# Altium PCB IOT_Speaker.PcbDoc (part 2 of 3)
Units mil, origin at the board's own origin, x right, y up, seen from the top; angles counter-clockwise.
Board outline 2439.53 x 2669.05 mil, 2 copper layers (Top Layer, Bottom Layer), stack 57 mil thick; 125 components, 73 nets, 403 pads, 148 vias.
Unrouted connection lines stored in the file: 20.
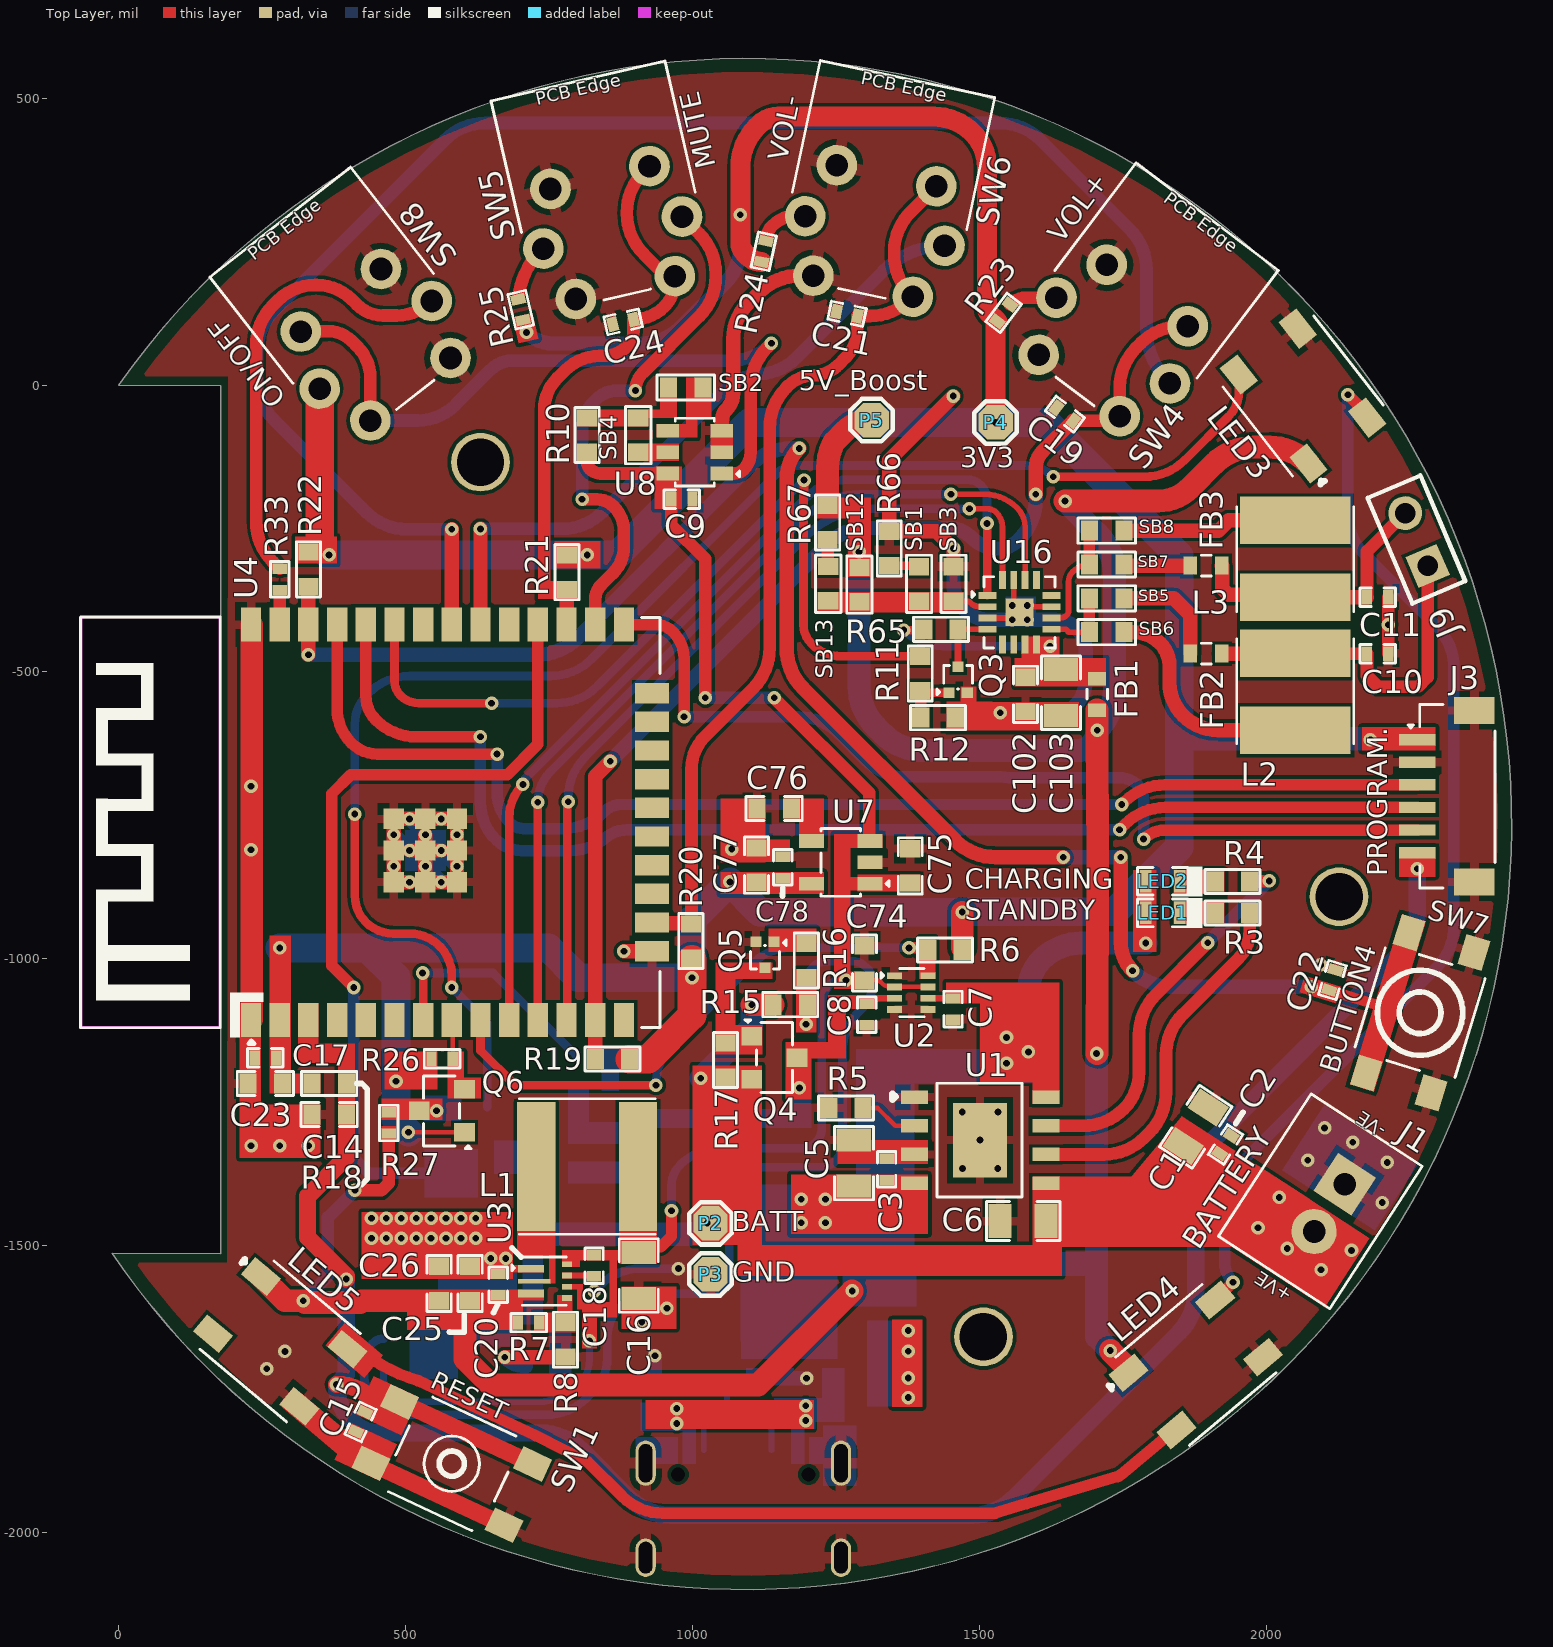
[diagram p0: Top Layer view]

## Part data (continued)
R1 R2: library part RC0603FR-075K1L, "RES 5.1K OHM 1% 1/10W 0603", Case Code (Imperial)=0603, Case Code (Metric)=1608, LCSC Part Number=C105580, Manufacturer=Yageo, Max Operating Temperature=155°C, Max Power Dissipation=100mW, Min Operating Temperature=-55°C, Package Quantity=1, Resistance=5.1kR, Resistance Tolerance=1%, Resistor Type="Thick Film", Temperature Coefficient=100ppm/°C, Voltage Rating=50V, Case/Package=0603, Category="Chip SMD Resistors", ComponentLink1Description=https://datasheet.ciiva.com/46395/443971-46395016.pdf?src-supplier=Element14, ComponentLink1URL=https://datasheet.ciiva.com/46395/443971-46395016.pdf?src-supplier=Element14, ComponentLink2Description=https://datasheet.ciiva.com/2454/pyu-r-int-thick-7-2454046.pdf?src-supplier=Digi-Key, ComponentLink2URL=https://datasheet.ciiva.com/2454/pyu-r-int-thick-7-2454046.pdf?src-supplier=Digi-Key, ComponentLink3Description=https://datasheet.ciiva.com/2454/pyu-r-int-thick-7-2454047.pdf?src-supplier=Digi-Key, ComponentLink3URL=https://datasheet.ciiva.com/2454/pyu-r-int-thick-7-2454047.pdf?src-supplier=Digi-Key, ComponentLink4Description=https://datasheet.ciiva.com/2454/pyu-r-int-thick-7-2454045.pdf?src-supplier=Digi-Key, ComponentLink4URL=https://datasheet.ciiva.com/2454/pyu-r-int-thick-7-2454045.pdf?src-supplier=Digi-Key, ComponentLink5Description=https://datasheet.ciiva.com/15189/getdatasheetpartid-326732-15189786.pdf?src-supplier=Verical, ComponentLink5URL=https://datasheet.ciiva.com/15189/getdatasheetpartid-326732-15189786.pdf?src-supplier=Verical, Construction=Rectangular, Depth=0.8mm, Features="Moisture Resistant", Height=0.022inch, Item Type=Resistor, Lead Free="Lead Free", Length=0.063inch, Manufacturer Part Number=RC0603FR-075K1L, Military Standard=Not, Number of Pins=2, Number of Terminations=2, Packaging="Tape and Reel", Power Rating=100mW, Pricing 1="5000=0.00133, 10000=0.00131, 20000=0.00127 (USD)", Reach SVHC Compliant=Yes, RoHS=Yes, RoHS Compliant=Yes, Series=RC, Size Code=0603, Stock 1=100000, Supplier 1=Avnet, Supplier Part Number 1=RC0603FR-075K1L, Termination=SMD/SMT, Tolerance=1%, Voltage Rating (DC)=50V, Width=0.031inch
R3: library part RC0603FR-07220RL, "RES SMD 220 OHM 1% 1/10W 0603", Case Code (Imperial)=0603, Case Code (Metric)=1608, LCSC Part Number=C107696, Manufacturer=Yageo, Max Operating Temperature=155°C, Max Power Dissipation=100mW, Min Operating Temperature=-55°C, Package Quantity=1, Supplier Part Number 1=311-220HRCT-ND, Temperature Coefficient=100ppm/°C, Tolerance=1%, Voltage Rating=50V, Case/Package=0603, ComponentLink1Description=http://www.yageo.com/documents/recent/PYu-RC_Group_51_RoHS_L_10.pdf?src-supplier=Digi-Key, ComponentLink1URL=http://www.yageo.com/documents/recent/PYu-RC_Group_51_RoHS_L_10.pdf?src-supplier=Digi-Key, ComponentLink2Description=http://www.farnell.com/datasheets/1868787.pdf?src-supplier=Element14, ComponentLink2URL=http://www.farnell.com/datasheets/1868787.pdf?src-supplier=Element14, Composition="Thick Film", Depth=0.8mm, Features="Moisture Resistant", Height=0.022inch, Item Type=Resistor, Lead Free="Lead Free", Length=1.6mm, Manufacturer Part Number=RC0603FR-07220RL, Military Standard=Not, Number of Pins=2, Number of Terminations=2, Packaging="Tape and Reel", Power Rating=100mW, Pricing 1="1=0.1, 10=0.023, 100=0.0094, 1000=0.00421, 2500=0.00366 (USD)", REACH SVHC="No SVHC", Resistance=220R, Stock 1=5843995, Supplier 1=Digi-Key, Termination=SMD/SMT, Voltage Rating (DC)=50V, Width=0.031inch
R4: library part RC0603JR-07330RL, "RES  SMD 330R 100 mW 0603", Case Code (Imperial)=0603, Case Code (Metric)=1608, LCSC Part Number=C105879, Manufacturer=Yageo, Max Operating Temperature=155°C, Max Power Dissipation=100mW, Min Operating Temperature=-55°C, Package Quantity=5000, Resistance Tolerance=5%, Resistor Type="Thick Film", Supplier Part Number 1=311-330GRCT-ND, Temperature Coefficient=100ppm/°C, Voltage Rating=50V, Case/Package=0603, Category="Chip SMD Resistors", Construction=Rectangular, Depth=0.8mm, Features="Moisture Resistant", Height=0.45mm, Item Type=Resistor, Lead Free="Lead Free", Length=1.6mm, Manufacturer Part Number=RC0603JR-07330RL, Military Standard=Not, Number of Pins=2, Number of Terminations=2, Packaging="Tape and Reel", Power Rating=100mW, Pricing 1="1=0.10000, 10=0.02000, 100=0.00800, 1000=0.00360, 2500=0.00312 (USD)", REACH SVHC="No SVHC", Resistance=330R, RoHS=Yes, RoHS Compliant=Yes, Series=RC, Size Code=0603, Stock 1=1074593, Supplier 1=Digi-Key, Termination=SMD/SMT, Tolerance=5%, Voltage Rating (DC)=50V, Width=0.8mm
R5: library part 0603WAF1201T5E, "Thick Film Resistors 75V 1.2kΩ 0603 Chip Resistor - Surface Mount ROHS", LCSC Part Number=C22765, Manufacturer=UNI-ROYAL, ComponentLink1Description=LCSC, ComponentLink1URL=https://lcsc.com/product-detail/Chip-Resistor-Surface-Mount_UNI-ROYAL-Uniroyal-Elec-0603WAF1201T5E_C22765.html, Footpint=0603, Item Type=Resistor, Manufacturer Part Number=0603WAF1201T5E
R6 R10 R15 R18 R19 R20 R21 R22: library part RC0603FR-0710KL, "RES SMD 10K Ohm 1% 1/10W 0603", Case Code (Imperial)=0603, Case Code (Metric)=1608, LCSC Part Number=C98220, Manufacturer=Yageo, Max Operating Temperature=155°C, Max Power Dissipation=100mW, Min Operating Temperature=-55°C, Resistance=10kR, Resistance Tolerance=1%, Resistor Type="Thick Film", Supplier Part Number 1=311-10.0KHRCT-ND, Temperature Coefficient=100ppm/°C, Voltage Rating=75V, Voltage Rating (DC)=50V, Case/Package=0603, Category="Chip SMD Resistors", ComponentLink1Description=https://datasheet.ciiva.com/7660/38590-7660789.pdf?src-supplier=Element14, ComponentLink1URL=https://datasheet.ciiva.com/7660/38590-7660789.pdf?src-supplier=Element14, ComponentLink2Description=https://datasheet.ciiva.com/7983/443971-7983596.pdf?src-supplier=Element14, ComponentLink2URL=https://datasheet.ciiva.com/7983/443971-7983596.pdf?src-supplier=Element14, ComponentLink3Description=https://datasheet.ciiva.com/22747/443971-22747519.pdf?src-supplier=Element14, ComponentLink3URL=https://datasheet.ciiva.com/22747/443971-22747519.pdf?src-supplier=Element14, ComponentLink4Description=https://datasheet.ciiva.com/46440/1868787-46440891.pdf?src-supplier=Element14, ComponentLink4URL=https://datasheet.ciiva.com/46440/1868787-46440891.pdf?src-supplier=Element14, ComponentLink5Description=https://datasheet.ciiva.com/7746/1738695-7746239.pdf?src-supplier=Element14, ComponentLink5URL=https://datasheet.ciiva.com/7746/1738695-7746239.pdf?src-supplier=Element14, ComponentLink6Description=https://datasheet.ciiva.com/15189/getdatasheetpartid-409289-15189591.pdf?src-supplier=Verical, ComponentLink6URL=https://datasheet.ciiva.com/15189/getdatasheetpartid-409289-15189591.pdf?src-supplier=Verical, Construction=Rectangular, Depth=0.8mm, Features="Moisture Resistant", Height=0.45mm, Item Type=Resistor, Lead Free="Lead Free", Lead Pitch=0.3mm, Length=1.6mm, Manufacturer Part Number=RC0603FR-0710KL, Military Standard=Not, Number of Pins=2, Number of Terminations=2, Packaging="Tape and Reel", Power Rating=100mW, Pricing 1="1=0.10000, 10=0.02400, 100=0.00970, 1000=0.00436, 2500=0.00378 (USD)", REACH SVHC=Unknown, RoHS=Yes, RoHS Compliant=Yes, Series=RC, Size Code=0603, Stock 1=25249139, Supplier 1=Digi-Key, Termination=SMD/SMT, Tolerance=1%, Weight=7.1E-05oz, Width=0.8mm
R7: library part FRC0402F7323TS, "±1% 732kΩ 0402 Chip Resistor - Surface Mount ROHS", LCSC Part Number=C5159692, Manufacturer=FOJAN, Package=0402, ComponentLink1Description=LCSC, ComponentLink1URL=https://www.lcsc.com/product-detail/Chip-span-style-background-color-ff0-Resistor-span-Surface-Mount_FOJAN-FRC0402F7323TS_C5159692.html, Item Type=Resistor, Manufacturer Part Number=FRC0402F7323TS
R8 R66 R67: library part RT0603BRD07100KL, "RES SMD 100K OHM 0.1% 1/10W 0603", Case Code (Imperial)=0603, Case Code (Metric)=1608, LCSC Part Number=C122538, Manufacturer=Yageo, Max Operating Temperature=125°C, Max Power Dissipation=100mW, Min Operating Temperature=-55°C, Package Quantity=5000, Resistance=100kR, Supplier Part Number 1=YAG1235CT-ND, Temperature Coefficient=25ppm/°C, Tolerance=0.1%, Voltage Rating=75V, Case/Package=0603, ComponentLink1Description=http://documents.rs-components.com/techlib://itc_doclist_GB.htm?stockno=6174810&src-supplier=RSComponents, ComponentLink1URL=http://documents.rs-components.com/techlib://itc_doclist_GB.htm?stockno=6174810&src-supplier=RSComponents, Composition="Thin Film", Depth=0.8mm, Features="Moisture Resistant", Height=0.022inch, Item Type=Resistor, Lead Free="Lead Free", Length=1.6mm, Manufacturer Part Number=RT0603BRD07100KL, Military Standard=Not, Mount="Surface Mount", Number of Terminations=2, Packaging="Tape and Reel", Power Rating=100mW, Pricing 1="1=0.39, 10=0.332, 100=0.1298, 1000=0.05435, 2500=0.04982 (USD)", Stock 1=53395, Supplier 1=Digi-Key, Termination=SMD/SMT, Voltage Rating (DC)=75V, Width=0.031inch, Working Voltage=75V
R9 R12 R54: library part RC0603JR-0747KL, "RES 47K OHM 5% 1/10W 0603", Case Code (Imperial)=0603, Case Code (Metric)=1608, LCSC Part Number=C127447, Manufacturer=Yageo, Max Operating Temperature=155°C, Max Power Dissipation=100mW, Min Operating Temperature=-55°C, Package Quantity=5000, Resistance=47kR, Resistance Tolerance=1%, Resistor Type="Thick Film", Temperature Coefficient=100ppm/°C, Tolerance=5%, Voltage Rating=50V, Case/Package=0603, Category="Chip SMD Resistors", ComponentLink1Description=http://www.farnell.com/datasheets/443971.pdf, ComponentLink1URL=http://www.farnell.com/datasheets/443971.pdf, ComponentLink2Description=http://www.mouser.com/catalog/specsheets/RC0603.pdf, ComponentLink2URL=http://www.mouser.com/catalog/specsheets/RC0603.pdf, ComponentLink3Description=https://datasheet.ciiva.com/46395/443971-46395003.pdf?src-supplier=Element14, ComponentLink3URL=https://datasheet.ciiva.com/46395/443971-46395003.pdf?src-supplier=Element14, ComponentLink4Description=https://datasheet.ciiva.com/12558/rc0603-272842-12558744.pdf?src-supplier=Mouser, ComponentLink4URL=https://datasheet.ciiva.com/12558/rc0603-272842-12558744.pdf?src-supplier=Mouser, Composition="Thick Film", Construction=Rectangular, Depth=0.8mm, Features="Moisture Resistant", Height=0.45mm, Lead Free="Lead Free", Length=1.6mm, Manufacturer Part Number=RC0603JR-0747KL, Military Standard=Not, Number of Pins=2, Number of Terminations=2, Packaging="Tape and Reel", Power Rating=100mW, Pricing 1="5000=0.0025, 10000=0.0022, 25000=0.0019, 1=0.0011, 6000=0.001 (USD)", Pricing 2="1=0.10000, 10=0.02300, 100=0.00930, 1000=0.00417, 2500=0.00362 (USD)", REACH SVHC="No SVHC", RoHS=Yes, RoHS Compliant=Yes, Series=RC, Size Code=0603, Stock 1=599135, Stock 2=1087850, Supplier 1=Arrow, Supplier 2=Digi-Key, Supplier Part Number 1=RC0603JR-0747KL, Supplier Part Number 2=311-30.0KHRCT-ND, Termination=SMD/SMT, Voltage Rating (DC)=50V, Width=0.8mm
R11 R56: library part RC0603JR-074K7L, "RES SMD 4.7K OHM 5% 1/10W 0603", Case Code (Imperial)=0603, Case Code (Metric)=1608, LCSC Part Number=C105428, Manufacturer=Yageo, Max Operating Temperature=155°C, Min Operating Temperature=-55°C, Power Rating=100mW, Resistance=4.7kR, Supplier Part Number 1=311-4.7KGRCT-ND, Temperature Coefficient=100ppm/°C, Tolerance=5%, Voltage Rating=50V, Case/Package=0603, ComponentLink1Description=http://www.farnell.com/datasheets/443971.pdf?src-supplier=Element14, ComponentLink1URL=http://www.farnell.com/datasheets/443971.pdf?src-supplier=Element14, Composition="Thick Film", Depth=0.8mm, Lead Free="Lead Free", Length=1.6mm, Manufacturer Part Number=RC0603JR-074K7L, Military Standard=Not, Number of Pins=2, Packaging="Tape and Reel", Pricing 1="1=0.1, 10=0.02, 100=0.0081, 1000=0.00362, 2500=0.00314 (USD)", REACH SVHC="No SVHC", Stock 1=19706643, Supplier 1=Digi-Key, Termination=SMD/SMT, Voltage Rating (DC)=50V, Width=0.8mm
  R56: Item Type=Resistor
R13 R14: library part RC0603FR-070RL, "RES SMD 0R, 1%, 0.1W, 0603", LCSC Part Number=C100044, Manufacturer=Yageo, Package=0603, ComponentLink9Description=LCSC, ComponentLink9URL=https://www.lcsc.com/product-detail/Chip-Resistor-Surface-Mount_YAGEO-RC0603FR-070RL_C100044.html, Item Type=Resistor, Manufacturer Part Number=RC0603FR-070RL
R16 R17 R28 R55: library part RC0603FR-071KL, "RES SMD 1K OHM 1% 1/10W 0603", Case Code (Imperial)=0603, Case Code (Metric)=1608, LCSC Part Number=C22548, Manufacturer=Yageo, Max Operating Temperature=155°C, Min Operating Temperature=-55°C, Power Rating=100mW, Resistance=1kR, Supplier Part Number 1=311-1.00KHRDKR-ND, Temperature Coefficient=100ppm/°C, Tolerance=1%, Voltage Rating=50V, Case/Package=0603, ComponentLink1Description=https://www.verical.com/server-webapp/html/getDatasheet?partID=409289&src-supplier=Verical, ComponentLink1URL=https://www.verical.com/server-webapp/html/getDatasheet?partID=409289&src-supplier=Verical, ComponentLink2Description=http://documents.rs-components.com/techlib://itc_doclist_GB.htm?stockno=5048928&src-supplier=RSComponents, ComponentLink2URL=http://documents.rs-components.com/techlib://itc_doclist_GB.htm?stockno=5048928&src-supplier=RSComponents, ComponentLink3Description=http://www.yageo.com/documents/recent/PYu-RC0603_51_RoHS_L_4.pdf?src-supplier=Avnet+Europe, ComponentLink3URL=http://www.yageo.com/documents/recent/PYu-RC0603_51_RoHS_L_4.pdf?src-supplier=Avnet+Europe, ComponentLink4Description=http://www.farnell.com/datasheets/2167052.pdf?src-supplier=Element14, ComponentLink4URL=http://www.farnell.com/datasheets/2167052.pdf?src-supplier=Element14, ComponentLink5Description=http://www.farnell.com/datasheets/1868787.pdf?src-supplier=Element14, ComponentLink5URL=http://www.farnell.com/datasheets/1868787.pdf?src-supplier=Element14, ComponentLink6Description=http://www.yageo.com/documents/recent/PYu-RC_Group_51_RoHS_L_2.pdf?src-supplier=Avnet, ComponentLink6URL=http://www.yageo.com/documents/recent/PYu-RC_Group_51_RoHS_L_2.pdf?src-supplier=Avnet, ComponentLink7Description=https://www.verical.com/server-webapp/html/getDatasheet?partID=404327&src-supplier=Verical, ComponentLink7URL=https://www.verical.com/server-webapp/html/getDatasheet?partID=404327&src-supplier=Verical, ComponentLink8Description=http://www.farnell.com/datasheets/443971.pdf?src-supplier=Element14, ComponentLink8URL=http://www.farnell.com/datasheets/443971.pdf?src-supplier=Element14, Composition="Thick Film", Contact Plating=Tin,Matte, Depth=0.8mm, Height=0.45mm, Item Type=Resistor, Lead Free="Lead Free", Length=1.6mm, Manufacturer Part Number=RC0603FR-071KL, Military Standard=Not, Packaging="Tape and Reel", Pricing 1="1=0.1, 10=0.023, 100=0.0094, 1000=0.0042, 2500=0.0037 (USD)", Radiation Hardening=No, REACH SVHC="No SVHC", Stock 1=21472395, Supplier 1=Digi-Key, Termination=SMD/SMT
R23 R24 R25 R33: library part ERA2AEB680X, "RES SMD 68 OHM 0.1% 1/16W 0402", Case Code (Imperial)=0402, Case Code (Metric)=1005, LCSC Part Number=C445573, Manufacturer=Panasonic, Manufacturer Part Number=ERA-2AEB680X, Max Operating Temperature=155°C, Max Power Dissipation=63mW, Min Operating Temperature=-55°C, Package Quantity=10000, Resistor Type="Thin Film,Metal Film", Temperature Coefficient=25ppm/°C, Tolerance=0.1%, Voltage Rating=25V, Case/Package=0402, Category="Chip SMD Resistors", ComponentLink1Description=https://datasheet.ciiva.com/5838/328837-5838032.pdf?src-supplier=Farnell, ComponentLink1URL=https://datasheet.ciiva.com/5838/328837-5838032.pdf?src-supplier=Farnell, ComponentLink2Description=https://datasheet.ciiva.com/11812/0900766b80beefcc-11812130.pdf?src-supplier=RSComponents, ComponentLink2URL=https://datasheet.ciiva.com/11812/0900766b80beefcc-11812130.pdf?src-supplier=RSComponents, ComponentLink3Description=https://datasheet.ciiva.com/7657/328837-7657366.pdf?src-supplier=Element14, ComponentLink3URL=https://datasheet.ciiva.com/7657/328837-7657366.pdf?src-supplier=Element14, ComponentLink4Description=https://datasheet.ciiva.com/7944/328837-7944487.pdf?src-supplier=Element14, ComponentLink4URL=https://datasheet.ciiva.com/7944/328837-7944487.pdf?src-supplier=Element14, ComponentLink5Description=https://datasheet.ciiva.com/17208/aoa0000ce26-17208797.pdf?src-supplier=Avnet+Europe, ComponentLink5URL=https://datasheet.ciiva.com/17208/aoa0000ce26-17208797.pdf?src-supplier=Avnet+Europe, Contact Plating=Tin, Depth=0.5mm, Height=0.35mm, Lead Free="Lead Free", Length=1mm, Military Standard=Not, Mount="Surface Mount", Number of Pins=2, Number of Terminations=2, Packaging="Tape and Reel", Power Rating=63mW, Pricing 1="1=0.36470, 10000=0.05710 (USD)", Radiation Hardening=No, REACH SVHC="No SVHC", Resistance=68R, RoHS=Yes, Stock 1=1, Supplier 1="Arrow Electronics", Supplier Part Number 1=ERA-2AEB680X, Voltage Rating (DC)=25V, Width=0.02inch
R26 R27: library part RC0402FR-0710KL, "RES 10K OHM 1% 1/16W 0402", Case Code (Imperial)=0402, Case Code (Metric)=1005, LCSC Part Number=C60490, Manufacturer=Yageo, Max Operating Temperature=155°C, Max Power Dissipation=63mW, Min Operating Temperature=-55°C, Power Rating=62.5mW, Resistance=10kR, Resistance Tolerance=1%, Resistor Type="Thick Film", Supplier Part Number 1=603-RC0402FR-0710KL, Temperature Coefficient=100ppm/°C, Voltage Rating=50V, Case/Package=0402, Category="Chip SMD Resistors", ComponentLink1Description=https://datasheet.ciiva.com/7660/38568-7660787.pdf?src-supplier=Element14, ComponentLink1URL=https://datasheet.ciiva.com/7660/38568-7660787.pdf?src-supplier=Element14, ComponentLink2Description=https://datasheet.ciiva.com/7849/1686128-7849814.pdf?src-supplier=Element14, ComponentLink2URL=https://datasheet.ciiva.com/7849/1686128-7849814.pdf?src-supplier=Element14, ComponentLink3Description=https://datasheet.ciiva.com/7983/1018594-7983486.pdf?src-supplier=Element14, ComponentLink3URL=https://datasheet.ciiva.com/7983/1018594-7983486.pdf?src-supplier=Element14, ComponentLink4Description=https://datasheet.ciiva.com/22747/1018594-22747512.pdf?src-supplier=Element14, ComponentLink4URL=https://datasheet.ciiva.com/22747/1018594-22747512.pdf?src-supplier=Element14, ComponentLink5Description=https://datasheet.ciiva.com/12667/pyu-rc0402-51-rohs-l-6-r-12667067.pdf?src-supplier=Mouser, ComponentLink5URL=https://datasheet.ciiva.com/12667/pyu-rc0402-51-rohs-l-6-r-12667067.pdf?src-supplier=Mouser, ComponentLink6Description=https://datasheet.ciiva.com/7849/1784430-7849813.pdf?src-supplier=Element14, ComponentLink6URL=https://datasheet.ciiva.com/7849/1784430-7849813.pdf?src-supplier=Element14, ComponentLink7Description=https://datasheet.ciiva.com/7849/1784430-7849815.pdf?src-supplier=Element14, ComponentLink7URL=https://datasheet.ciiva.com/7849/1784430-7849815.pdf?src-supplier=Element14, Construction=Rectangular, Depth=0.5mm, Features="Moisture Resistant", Height=0.32mm, Item Type=Resistor, Lead Free="Lead Free", Lead Pitch=0.2mm, Length=1mm, Manufacturer Part Number=RC0402FR-0710KL, Military Standard=Not, Number of Pins=2, Number of Terminations=2, Packaging="Tape and Reel", Pricing 1="1=0.10000, 10=0.01400, 50=0.01400, 100=0.00500, 1000=0.00300, 10000=0.00200 (USD)", REACH SVHC="No SVHC", RoHS=Yes, RoHS Compliant=Yes, Series=RC, Stock 1=18648329, Supplier 1=Mouser, Termination=SMD/SMT, Tolerance=1%, Voltage Rating (DC)=50V, Width=0.5mm, Working Voltage=50V
R65: library part RC0603FR-071ML, "RES SMD 1M OHM 1% 1/10W 0603", Case Code (Imperial)=0603, Case Code (Metric)=1608, LCSC Part Number=C105578, Manufacturer=Yageo, Max Operating Temperature=155°C, Min Operating Temperature=-55°C, Package Quantity=5000, Power Rating=100mW, Resistance=1MR, Supplier Part Number 1=311-1.00MHRDKR-ND, Temperature Coefficient=100ppm/°C, Tolerance=1%, Voltage Rating=50V, Case/Package=0603, ComponentLink1Description=http://www.farnell.com/datasheets/2167052.pdf?src-supplier=Mouser, ComponentLink1URL=http://www.farnell.com/datasheets/2167052.pdf?src-supplier=Mouser, ComponentLink2Description=http://www.farnell.com/datasheets/2167052.pdf?src-supplier=Element14, ComponentLink2URL=http://www.farnell.com/datasheets/2167052.pdf?src-supplier=Element14, ComponentLink3Description=http://documents.rs-components.com/techlib://itc_doclist_GB.htm?stockno=5048956&src-supplier=RSComponents, ComponentLink3URL=http://documents.rs-components.com/techlib://itc_doclist_GB.htm?stockno=5048956&src-supplier=RSComponents, Composition="Thick Film", Depth=0.8mm, Height=0.45mm, Lead Free="Lead Free", Length=1.6mm, Manufacturer Part Number=RC0603FR-071ML, Military Standard=Not, Number of Pins=2, Packaging="Tape and Reel", Pricing 1="1=0.1, 10=0.023, 100=0.0094, 1000=0.00421, 2500=0.00366 (USD)", REACH SVHC="No SVHC", Stock 1=3824601, Supplier 1=Digi-Key, Termination=SMD/SMT, Voltage Rating (DC)=50V, Width=0.8mm
SB1 SB2 SB3 SB4 SB5 SB6 SB7 SB8 SB12 SB13: "Solder Bridge ON", Manufacturer Part Number="Solder Bridge", Item Type="Solder Bridge"
SW1: "No NO 50mA 4.5mm 100000 260gf 12V -30℃~+85℃ 4.5mm 4.3mm Black Round Button Brick nogging SPST SMD Tactile Switches ROHS", LCSC Part Number=C381037, Manufacturer="XKB Connectivity", Package=Custom, ComponentLink1Description=LCSC, ComponentLink1URL=https://www.lcsc.com/product-detail/Tactile-Switches_XKB-Connectivity-TS-1109S-C-B_C381037.html, Item Type=Switch, Manufacturer Part Number=TS-1109S-C-B
SW4 SW5 SW6 SW8: "SWITCH TACTILE SPST-NO 0.05A 12V", Current Rating=50mA, Illumination Color=Green, Manufacturer=E-Switch, Max Operating Temperature=70°C, Min Operating Temperature=-20°C, Operating Force=160gf, Package Quantity=1, Supplier Part Number 1=EG6023-ND, Voltage Rating (DC)=12V, Actuator Material=PBT,Polybutylene, Category="Tactile Switches", ComponentLink1Description=https://datasheet.ciiva.com/2902/b200003h-2902974.pdf?src-supplier=Digi-Key, ComponentLink1URL=https://datasheet.ciiva.com/2902/b200003h-2902974.pdf?src-supplier=Digi-Key, Illumination Type=LED,Illuminated, Item Type="Tactile Switch", Lead Free="Lead Free", Manufacturer Part Number=TL1260GQRBLK, Mechanical Life=50000Cycles, Mounting Technology="Through Hole", Packaging=Bulk, Pricing 1="1=3.53, 10=3.387, 25=3.0924, 100=2.6801, 250=2.42976, 500=2.25304, 1000=2.09106, 2500=1.89963, 5000=1.8225 (USD)", RoHS=Yes, RoHS Compliant=Yes, Series=TL1260, Stock 1=1154, Supplier 1=Digi-Key, Switch Function=Off-Mom, Switch Travel=0.2mm, Termination="PC Pin", Throw Configuration=SPST
SW7: "No NO 50mA 4.5mm 100000 160gf 12V -30℃~+85℃ 4.5mm 8mm Black Round Button Brick nogging SPST SMD Tactile Switches ROHS", LCSC Part Number=C480323, Manufacturer="XKB Connectivity", Package=SMD, ComponentLink1Description=LCSC, ComponentLink1URL=https://www.lcsc.com/product-detail/span-style-background-color-ff0-Tactile-span-Switches_XKB-Connectivity-TS-1109S-B-J_C480323.html, Item Type=Switch, Manufacturer Part Number=TS-1109S-B-J
U1: "ESOP-8 Battery Management ICs ROHS", LCSC Part Number=C16581, Manufacturer=TOPPOWER, Package=ESOP-8, ComponentLink1Description=LCSC, ComponentLink1URL=https://www.lcsc.com/product-detail/Battery-Management-ICs_TOPPOWER-Nanjing-Extension-Microelectronics-TP4056-42-ESOP8_C16581.html, Item Type=Mosfet, Manufacturer Part Number=TP4056-42-ESOP8
U2: "OR Controller N+1 ORing Controller N-Channel 2:1 SOT-583", LCSC Part Number=C3235556, Manufacturer="Texas Instruments", Supplier Part Number 1=595-LM66200DRLR, Category="Integrated Circuits (ICs)", Item Type=IC, Manufacturer Part Number=LM66200DRLR, Pricing 1="1=0.80000, 10=0.70000, 50=0.65800, 100=0.53700, 1000=0.34000, 10000=0.30700 (USD)", RoHS=No, Stock 1=11717, Supplier 1=Mouser
U3: "8-A boost converter with 0.5-V ultra-low input voltage 7-VQFN-HR -40 to 125", LCSC Part Number=C915088, Manufacturer="Texas Instruments", Supplier Part Number 1=296-TPS61022RWURDKR-ND, Category="Voltage Regulators - Switching", ComponentLink1Description=LCSC, ComponentLink1URL=https://www.lcsc.com/product-detail/DC-DC-Converters_Texas-Instruments-TPS61022RWUR_C915088.html, Item Type=IC, Manufacturer Part Number=TPS61022RWUR, Pricing 1="1=1.88000, 10=1.68800, 25=1.59280, 100=1.35690, 250=1.27412, 500=1.11486, 1000=0.92374 (USD)", RoHS=Yes, Supplier 1=Digi-Key
U4: "SMD,18x25.5mm WiFi Modules ROHS", LCSC Part Number=C701342, Manufacturer="Espressif Systems", Supplier Part Number 1=356-ESP32WRM32E164PH, Category=Uncategorized, ComponentLink1Description=LCSC, ComponentLink1URL=https://www.lcsc.com/product-detail/WiFi-Modules_Espressif-Systems-ESP32-WROOM-32E-N8_C701342.html, Item Type=Module, Manufacturer Part Number=ESP32-WROOM-32E-N8, Pricing 1="1=3.30000, 10=3.30000, 50=3.30000, 100=3.30000, 1000=3.30000, 10000=3.30000 (USD)", RoHS=No, Stock 1=24616, Supplier 1=Mouser
U7: "SPX3819 Series 3.3 V 500 mA Fixed Output SMT LDO Regulator - SOT-23-5", LCSC Part Number=C9055, Manufacturer=MaxLinear, Supplier Part Number 1=23R9703, Category="Voltage Regulators - Linear", ComponentLink1Description=LCSC, ComponentLink1URL=https://www.lcsc.com/product-detail/Linear-Voltage-Regulators-LDO_MaxLinear-SPX3819M5-L-3-3-TR_C9055.html, Item Type=IC, Manufacturer Part Number=SPX3819M5-L-3-3/TR, RoHS=Yes, RoHS Compliant=Yes, Supplier 1=Newark
U8: "IC CNTRLR ON/OFF W/DEB TSOT23-6", Case/Package=SOT-23-6, LCSC Part Number=C79401, Manufacturer=Maxim, Max Operating Temperature=125°C, Max Power Dissipation=727W, Max Supply Voltage=5.5V, Min Operating Temperature=-40°C, Min Supply Voltage=2.7V, Number of Voltages Monitored=1, Operating Supply Current=7uA, Undervoltage Threshold=1.8V, Category="Interface ICs", ComponentLink1Description=https://datasheet.ciiva.com/4901/max16054-83881-4901086.pdf?src-supplier=Mouser, ComponentLink1URL=https://datasheet.ciiva.com/4901/max16054-83881-4901086.pdf?src-supplier=Mouser, ComponentLink2Description=https://datasheet.ciiva.com/1784/max16054-1784560.pdf?src-supplier=Digi-Key, ComponentLink2URL=https://datasheet.ciiva.com/1784/max16054-1784560.pdf?src-supplier=Digi-Key, ComponentLink3Description=https://datasheet.ciiva.com/14247/max16054-14247770.pdf?src-supplier=Avnet, ComponentLink3URL=https://datasheet.ciiva.com/14247/max16054-14247770.pdf?src-supplier=Avnet, ComponentLink4Description=https://datasheet.ciiva.com/1784/max16054-1784561.pdf?src-supplier=Digi-Key, ComponentLink4URL=https://datasheet.ciiva.com/1784/max16054-1784561.pdf?src-supplier=Digi-Key, ComponentLink5Description=https://datasheet.ciiva.com/1784/max16054-1784562.pdf?src-supplier=Digi-Key, ComponentLink5URL=https://datasheet.ciiva.com/1784/max16054-1784562.pdf?src-supplier=Digi-Key, Contact Plating=Tin,Matte, Height=0.73mm, Item Type=IC, Length=4mm, Manufacturer Part Number=MAX16054AZT+T, Mounting Technology="Surface Mount", Output Type=PUSH-PULL, Package Quantity=1, Packaging="Tape and Reel", Pins=6, Pricing 1="1=2.99700 (USD)", Radiation Hardening=No, RoHS=Yes, RoHS Compliant=Yes, Series=-, Stock 1=3, Supplier 1="Arrow Electronics", Supplier Part Number 1=MAX16054AZT+T, Watchdog Timer=No, Width=4mm
U10: "Power Supply Support Circuit, Fixed, 1 Channel, +3.1V, CMOS, PDSO5", Case/Package=LSSOP, LCSC Part Number=C253184, Manufacturer=Rohm, Max Operating Temperature=125°C, Min Operating Temperature=-25°C, Nominal Supply Voltage=2.4V, Package Body Material=Plastic, Package Equivalence Code=TSOP5/6,.11,37, Package Shape=Rectangular, Package Style="SMALL OUTLINE, LOW PROFILE, SHRINK PITCHMeter", Power Supplies=1.8/5V, Supplier Part Number 1=755-BU4231G-TR, Temperature Grade=OTHER, Threshold Voltage-Nom=3.1V, Adjustable Threshold=No, Category="Voltage Supervisors", Channels=1, ComponentLink1Description=https://datasheet.ciiva.com:443/pdfs/VipMasterIC/IC/ROHM/ROHMS33934/ROHMS34686-1.pdf?src-supplier=IHS+Markit, ComponentLink1URL=https://datasheet.ciiva.com:443/pdfs/VipMasterIC/IC/ROHM/ROHMS33934/ROHMS34686-1.pdf?src-supplier=IHS+Markit, ComponentLink2Description=https://datasheet.ciiva.com/6601/bu42xxg-e-6601781.pdf?src-supplier=Digi-Key, ComponentLink2URL=https://datasheet.ciiva.com/6601/bu42xxg-e-6601781.pdf?src-supplier=Digi-Key, ComponentLink3Description=https://datasheet.ciiva.com/6601/bu42xxg-e-6601782.pdf?src-supplier=Digi-Key, ComponentLink3URL=https://datasheet.ciiva.com/6601/bu42xxg-e-6601782.pdf?src-supplier=Digi-Key, ComponentLink4Description=https://datasheet.ciiva.com/6601/bu42xxg-e-6601784.pdf?src-supplier=Digi-Key, ComponentLink4URL=https://datasheet.ciiva.com/6601/bu42xxg-e-6601784.pdf?src-supplier=Digi-Key, ComponentLink5Description=https://datasheet.ciiva.com/22735/1747282-22735962.pdf?src-supplier=Element14, ComponentLink5URL=https://datasheet.ciiva.com/22735/1747282-22735962.pdf?src-supplier=Element14, ComponentLink6Description=https://datasheet.ciiva.com/15105/getdatasheetpartid-450589-15105309.pdf?src-supplier=Verical, ComponentLink6URL=https://datasheet.ciiva.com/15105/getdatasheetpartid-450589-15105309.pdf?src-supplier=Verical, Height - Seated (Max)=1.25mm, Item Type=IC, JESD-30 Code=R-PDSO-G5, Length=2.9mm, Manufacturer Part Number=BU4231G-TR, Moisture Sensitivity Level=1, Number of Channels=1, Pins=5, Pricing 1="1=0.63000, 10=0.53400, 50=0.53400, 100=0.37000, 1000=0.24200, 10000=0.22000 (USD)", Qualification Status="Not Qualified", Reach SVHC Compliant=Yes, RoHS=Yes, RoHS Compliant=Yes, Stock 1=3336, Supplier 1=Mouser, Surface Mount=Yes, Technology=CMOS, Terminal Form="Gull Wing", Terminal Pitch=0.95mm, Terminal Position=DUAL, Throw Configuration="POWER SUPPLY SUPPORT CIRCUIT", Width=1.6mm
U16: "Audio Amplifier, 1 Func, PQCC16", Case/Package=QCCN, LCSC Part Number=C910544, Manufacturer=Maxim, Max Operating Temperature=85°C, Max Supply Current=3mA, Min Operating Temperature=-40°C, Package Body Material=Plastic, Package Equivalence Code=LCC16,.12SQ,20, Package Shape=Square, Package Style="CHIP CARRIERMeter", Power Supplies=5V, Temperature Grade=INDUSTRIAL, Category="Amplifiers - Audio", Channels=1, ComponentLink1Description=https://datasheet.ciiva.com:443/pdfs/VipMasterIC/IC/MAXM/MAXM-S-A0007997446/MAXM-S-A0007997446-1.pdf?src-supplier=IHS+Markit, ComponentLink1URL=https://datasheet.ciiva.com:443/pdfs/VipMasterIC/IC/MAXM/MAXM-S-A0007997446/MAXM-S-A0007997446-1.pdf?src-supplier=IHS+Markit, ComponentLink2Description=https://datasheet.ciiva.com/29970/max98357a-max98357b-29970280.pdf?src-supplier=Avnet, ComponentLink2URL=https://datasheet.ciiva.com/29970/max98357a-max98357b-29970280.pdf?src-supplier=Avnet, Consumer IC Type="AUDIO AMPLIFIER", Item Type=IC, JESD-30 Code=S-PQCC-N16, Manufacturer Part Number=MAX98357AETE+T, Moisture Sensitivity Level=1, Pins=16, Pricing 1="1=2.83800 (USD)", Qualification Status="Not Qualified", Reach SVHC Compliant=Yes, RoHS=Yes, RoHS Compliant=Yes, Stock 1=2, Supplier 1="Arrow Electronics", Supplier Part Number 1=MAX98357AETE+T, Surface Mount=Yes, Terminal Form="No Lead", Terminal Pitch=0.5mm, Terminal Position=QUAD

## Free pads (board coordinates)
  round 102.36 hole 82.68 unplated mask+1.97: MH(630.28,-134.19) MH(1507,-1659) MH(2127,-892)

## Via types
v1: diameter 23.62, hole 11.81, Top Layer to Bottom Layer, tented both sides, 129 vias
v2: diameter 23.62, hole 11.81, Top Layer to Bottom Layer, 19 vias

## Nets (pads, with @x,y where several pads share a name; then routed paths per layer and width w, separated by ;. In a path a pad name is that pad's centre, name@x,y a point inside that pad or via, vN(x,y) a via of type N, cw(c..) or ccw(c..) an arc to the next point about the centre after c; other vN are vias at no path point)
3.3V: C17.2 C23.2 C77.2 C78.2 J3.1 P4.1 Q6.1 R6.1 R18.2 R19.2 R20.2 R21.2 R22.2 R23.2 R24.2 R25.2 R26.1 SW8.6 U4.2 U7.5 | length 6759
  Top Layer w8: v1(504.73,-1302.44) Q6.1@602.23,-1302.44
  Top Layer w22: 1112.57,450.78 1115.74,453.95 ; 1513.28,131.19 ccw(c1518.47,131.19) 1514.79,127.53 ; R23.2@1528.28,104.34 cw(c1537.98,104.34) R23.2@1531.12,111.2
  Top Layer w25: v1@2184.68,-618.05 J3.1@2263.28,-618.05
  Top Layer w35: 1112.57,450.78 ccw(c1183.28,380.07) 1083.28,380.07 1083.28,247.85 ccw(c1107.18,247.85) 1090.28,230.95 1096.38,224.85 ccw(c1120.28,248.75) R24.2@1120.28,214.95 ; 1115.74,453.95 cw(c1149.54,420.15) 1149.54,467.95 1420.68,467.95 cw(c1420.68,372.36) 1488.28,439.95 cw(c1427.92,379.6) 1513.28,379.6 1513.28,131.19 ; 1514.8,127.52 R23.2@1531.12,111.2 ; v1(1528.28,-65.05) R23.2@1528.28,104.34
  Top Layer w39.37: R6.1@1470.03,-980.74 v1(1470.03,-918.6)
  Top Layer w50: 349.87,-278.3 SW8.6@349.87,-5.99 ; R19.2@890.59,-1174.85 922.85,-1174.85 999,-1098.7 v1(999,-1033.05) R20.2@999,-1001.13
  Bottom Layer w22: 977.84,99.24 ccw(c909.81,172.54) 979.88,101.19 ccw(c909.81,172.54) 980.52,101.83 ; 1848.46,-618.67 cw(c1849.96,-620.16) 1849.96,-618.05
  Bottom Layer w25: v1(710.49,91.95) ccw(c757.35,138.81) 757.35,72.54 909.81,72.54 ccw(c909.81,172.54) 977.84,99.24 ; 980.52,101.83 1057.6,178.9 ccw(c996.27,240.23) 1083,240.23 v1(1083,297)
  Bottom Layer w50: v1(280.28,-981.05) 432.26,-981.05 ; v1(366.34,-296.05) v1(816.28,-296.05) 868.7,-296.05 1099.7,-65.05 v1(1528.28,-65.05) 1616.18,-65.05 1848.46,-297.33 1848.46,-618.67 1848.46,-805.69 1736.11,-918.05 v1@1470.03,-918.05 ; v1(504.73,-1302.44) 482.98,-1280.69 v1(482.98,-1213.55) 482.98,-1031.77 432.26,-981.05 ; v1@1065.28,-866.68 1117.2,-918.6 v1(1470.03,-918.6) ; v1(1065.28,-866.05) 999,-932.33 v1(999,-1033.05) 800.88,-1033.05 748.88,-981.05 432.26,-981.05
  other v1: 2181.68,-618.05
5V: C3.2 C5.2 C7.2 C13.2 FB7.2 LED1.1 LED2.1 U1.4 U1.8 U2.6 | length 356.5
  Bottom Layer w40: v1(1585.4,-1162.23) 1585.4,-1056.69 cw(c1663.51,-1056.69) 1608.28,-1001.46 cw(c1677.88,-1071.06) 1677.88,-972.63 v1(1790.15,-972.63)
  other v1: 1189.28,-1460.05 1231.64,-1460.05 1189.28,-1419.05 1231.64,-1419.05 1547.28,-1182.05 1547.28,-1137.05
5V_BOOST: C20.2 C25.2 C26.2 FB1.1 LED3.1 LED4.1 LED5.1 P5.1 R7.2 R27.1 R67.2 SB12.2 U3.3 | length 4590.9
  Top Layer w22: v1(411.5,-1403.62) 457.6,-1403.62 470.48,-1390.73 R27.1@470.48,-1304.68
  Top Layer w25: 1290.28,-254.67 1290.28,-317.05 SB12.2@1290.88,-317.65
  Top Layer w40: LED5.1@247.64,-1554.02 289.67,-1596.05 v1(321.26,-1596.05) 324.45,-1599.24 420.27,-1599.24 423.46,-1596.05 519.28,-1596.05 ; 589.5,-1610.6 589.5,-1612.84 603.45,-1626.79 603.45,-1697.82 648.41,-1742.79 1114.54,-1742.79 v1(1278.28,-1579.05) ; R67.2@1235.5,-209.42 1235.5,-143.39 cw(c1328.54,-143.39) 1246.75,-99.05 1265.29,-80.51 cw(c1312.28,-127.49) P5.1@1312.28,-61.05 ; v1(1649.28,-202.05) 1810.34,-202.05 ccw(c1810.34,-120.11) 1868.28,-178.05 1908.99,-137.34 cw(c1979.7,-208.05) 1979.7,-108.05 2004.75,-108.05 cw(c2004.75,-205.54) LED3.1@2073.69,-136.6 ; v1@1705.28,-1165.05 1706.28,-823.16 ccw(c1669.28,-823.05) 1706.28,-822.88 1705.28,-601.94 cw(c1745.28,-601.76) v1(1705.28,-601.76) FB1.1@1705.28,-566.61 ; v1(1728.28,-1683.05) 1755.42,-1710.18 cw(c1744.05,-1721.55) LED4.1@1760.12,-1721.55
  Bottom Layer w22: v1(321.26,-1596.05) 364.28,-1553.02 364.28,-1450.84 v1(411.5,-1403.62)
  Bottom Layer w40: v1(1290.28,-290.77) 1290.28,-524.63 ccw(c1390.28,-524.63) 1319.57,-595.34 1331.99,-607.76 ccw(c1402.7,-537.05) 1402.7,-637.05 1669.99,-637.05 ccw(c1669.99,-601.76) v1(1705.28,-601.76) 1705.99,-601.05 ccw(c1635.28,-530.34) 1735.28,-530.34 1735.28,-329.47 ccw(c1635.28,-329.47) 1705.99,-258.76 v1(1649.28,-202.05) ; v1(1704.28,-1165.05) 1704.28,-1659.05 v1(1728.28,-1683.05)
AMPLIFIER: R11.2 U4.33 | length 1474.4
  Top Layer w15: U4.33@480.34,-417.56 480.34,-515.66 ccw(c516.15,-515.66) 490.83,-540.99 ccw(c523.09,-508.72) 523.09,-554.35 v1(649.66,-554.35) ; v1(1194.27,-165.49) 1193.45,-207.01 ccw(c1208.44,-207.31) 1193.44,-207.31 1193.44,-417.64 ccw(c1240.59,-417.64) 1207.25,-450.97 ccw(c1259.57,-398.66) 1259.57,-472.65 R11.2@1396.88,-472.65
  Bottom Layer w15: v1(649.66,-554.35) 763.1,-554.35 ccw(c763.1,-454.35) 797.96,-548.08 ccw(c763.1,-454.35) 833.81,-525.06 1164.26,-194.61 cw(c1174.88,-205.2) 1164.44,-194.43 v1(1194.27,-165.49)
BAT_ADC: C83.2 D2.2 R9.1 R54.2 U4.28 | length 1480.5
  Top Layer w20: v1(409.28,-1050.05) 371.28,-1012.05 371.28,-711.97 404.2,-679.05 677.28,-679.05 730.34,-625.98 U4.28@730.34,-417.56
  Bottom Layer w20: v1(409.28,-1050.05) 409.28,-1347.28 435.86,-1373.86 579.29,-1373.86 D2.2@547.24,-1341.8
BAT_STAT: R56.1 U4.7 | length 412.1
  Top Layer w15: U4.7@530.34,-1106.53 530.34,-1031.01 534.28,-1027.07 v1@534.28,-1024.74
  Bottom Layer w15: v1(529.28,-1024.74) 652.15,-1024.74 786.6,-1159.19 789.1,-1159.19 796.6,-1166.69 R56.1@796.6,-1169.19
BATT: C1.2 C2.2 C6.2 C81.2 J1.2 P2.1 Q4.2 R15.2 R17.2 U1.5 U10.2 | length 202
  Top Layer w39.37: v1(1103.11,-1080.05) R15.2@1140.28,-1080.05
  Bottom Layer w39.37: v1(1014.28,-1208.05) 1103.11,-1119.22 v1(1103.11,-1080.05)
  other v1: 2095.68,-1541.99 2148.66,-1508.34 2036.68,-1504.99 1985.68,-1468.99 1025.72,-1460.58 2022.68,-1415.99
BCLK: U4.12 U16.16 | length 1478.8
  Top Layer w10: v1(1482.56,-215.57) 1513.89,-215.57 cw(c1513.89,-237.68) 1529.52,-222.05 cw(c1503.38,-248.18) 1540.35,-248.18 U16.16@1540.35,-339.94
  Top Layer w15: U4.12@780.34,-1106.54 781.81,-1105.07 781.81,-727.52 v1(783.28,-726.05)
  Bottom Layer w15: v1(783.28,-726.05) 783.28,-719.14 cw(c883.28,-719.14) 812.57,-648.43 1197.17,-263.82 cw(c1313.66,-380.31) 1313.66,-215.57 v1(1482.56,-215.57)
BUTTON_1: C19.1 R19.1 SW4.1 SW4.2 U4.13 | length 1972.1
  Top Layer w22: C19.1@1663.86,-61.75 1726.26,-61.75 ccw(c1726.26,-35.91) SW4.2@1744.53,-54.18 1744.53,-5.07 cw(c1844.53,-5.07) 1773.82,65.64 1781.71,73.53 cw(c1852.42,2.82) 1852.42,102.82 SW4.1@1863.27,102.82
  Top Layer w25: R19.1@830.59,-1174.85 830.59,-1106.78 U4.13@830.34,-1106.53 830.34,-681.73 v1(856.63,-655.44) ; v1(1598.28,-190.26) 1598.28,-144.17 cw(c1638.93,-144.17) 1610.19,-115.43 C19.1@1663.86,-61.75
  Bottom Layer w25: v1(856.63,-655.44) 1233.73,-278.34 cw(c1304.45,-349.05) 1304.45,-249.05 1446.65,-249.05 cw(c1446.65,-303.67) 1485.28,-265.05 ccw(c1532.59,-217.73) 1532.59,-284.65 ccw(c1532.59,-234.09) 1568.34,-269.84 1568.99,-269.19 ccw(c1498.28,-198.48) 1598.28,-198.48 v1(1598.28,-190.26)
BUTTON_2: C21.1 R20.1 SW6.1 SW6.2 U4.16 | length 1591.8
  Top Layer w22: R20.1@997,-939.13 ccw(c994.39,-936.53) 998.08,-936.53 998.08,-669.13 cw(c1077.95,-669.13) 1021.47,-612.66 1105.17,-528.96 ccw(c1034.46,-458.25) 1134.46,-458.25 1134.46,-74.76 cw(c1234.46,-74.76) 1163.75,-4.05 1166.44,-1.35 cw(c1210.69,-45.59) 1210.69,16.98 ccw(c1210.69,77.08) 1211.19,16.98 ccw(c1210.69,77.08) 1246.75,29 ccw(c1210.69,77.08) 1253.18,34.58 1267.62,49.01 ccw(c1219.92,96.71) 1287.37,96.71 C21.1@1287.37,120.44 1309,120.44 ccw(c1309,220.44) 1379.71,149.73 SW6.2@1383.98,154.01 1380.57,157.42 cw(c1451.28,228.13) 1351.28,228.13 1351.28,231.5 cw(c1451.28,231.5) 1365.46,282.83 cw(c1451.28,231.5) 1375.75,297.04 cw(c1451.28,231.5) 1380.57,302.21 SW6.1@1424.91,346.55
  Top Layer w25: U4.16@929.55,-936.85 930.7,-937.99 995.86,-937.99 R20.1@997,-939.13
BUTTON_3: C24.1 R21.1 SW5.1 SW5.2 U4.27 | length 1000.3
  Top Layer w22: 741.28,-360.05 741.28,-43.62 cw(c820.79,-43.62) 764.57,12.6 777.77,25.8 cw(c838.49,-34.92) 838.49,50.95 845.24,50.95 ccw(c845.24,108.99) 886.28,67.95 ccw(c860.52,93.71) 896.95,93.71 C24.1@896.95,114.48 ccw(c896.95,190.56) 950.74,136.76 ; R21.1@769.08,-356.05 R21.1@781.28,-356.05 ; SW5.1@924.88,381.82 914.65,371.59 ccw(c985.36,300.88) 885.36,300.88 885.36,299.69 ccw(c985.36,299.69) 914.65,228.98 942.63,201 ccw(c969.17,227.54) SW5.2@969.17,190.01 969.17,181.24 cw(c906.26,181.24) 953.77,140.01 cw(c906.26,181.24) 950.76,136.78
  Top Layer w25: U4.27@780.34,-417.56 779.81,-417.03 780.81,-416.03 R21.1@780.81,-356.51
BUTTON_4: C22.1 R22.1 SW7.1 SW7.2 U4.36 | length 2740.9
  Top Layer w25: v1(330.28,-470.05) 330.28,-417.62 U4.36@330.34,-417.56 R22.1@330.28,-351.05 ; v1(1185.82,-110.21) ccw(c1238.61,-162.99) v1(1185.82,-110.21) ccw(c1238.61,-162.99) 1163.96,-162.99 1163.96,-458.36 ccw(c1263.96,-458.36) 1193.25,-529.07 1457.77,-793.59 ccw(c1528.48,-722.88) 1528.48,-822.88 v1(1646.28,-822.88) ; v1(1746.28,-822.88) 1746.28,-970.97 ccw(c1817.03,-970.97) v1(1767,-1021)
  Bottom Layer w25: v1(330.28,-470.05) 728.53,-470.05 ccw(c728.53,-370.05) 799.24,-440.76 1100.5,-139.5 cw(c1171.21,-210.21) 1171.21,-110.21 v1(1185.82,-110.21) ; v1(1646.28,-822.88) v1(1746.28,-822.88) ; v1@1767.03,-1021.03 ccw(c1834.08,-953.92) 1834.08,-1048.79 v1(2078.86,-1048.79)